# Altium PCB STM32H743I-EVAL2PCBDESIGN.PcbDoc (part 3 of 23)
Units mil, origin at the board's own origin, x right, y up, seen from the top; angles counter-clockwise.
Board outline 6558 x 5417 mil, 8 copper layers (L1_TOP, L2_GND, L3_HS1, L4_POWER, L5_SIG, L6_HS2, L7_GND, L8_BOTTOM), stack 61.368 mil thick; 620 components, 588 nets, 2945 pads, 1724 vias.
Unrouted connection lines stored in the file: 1.
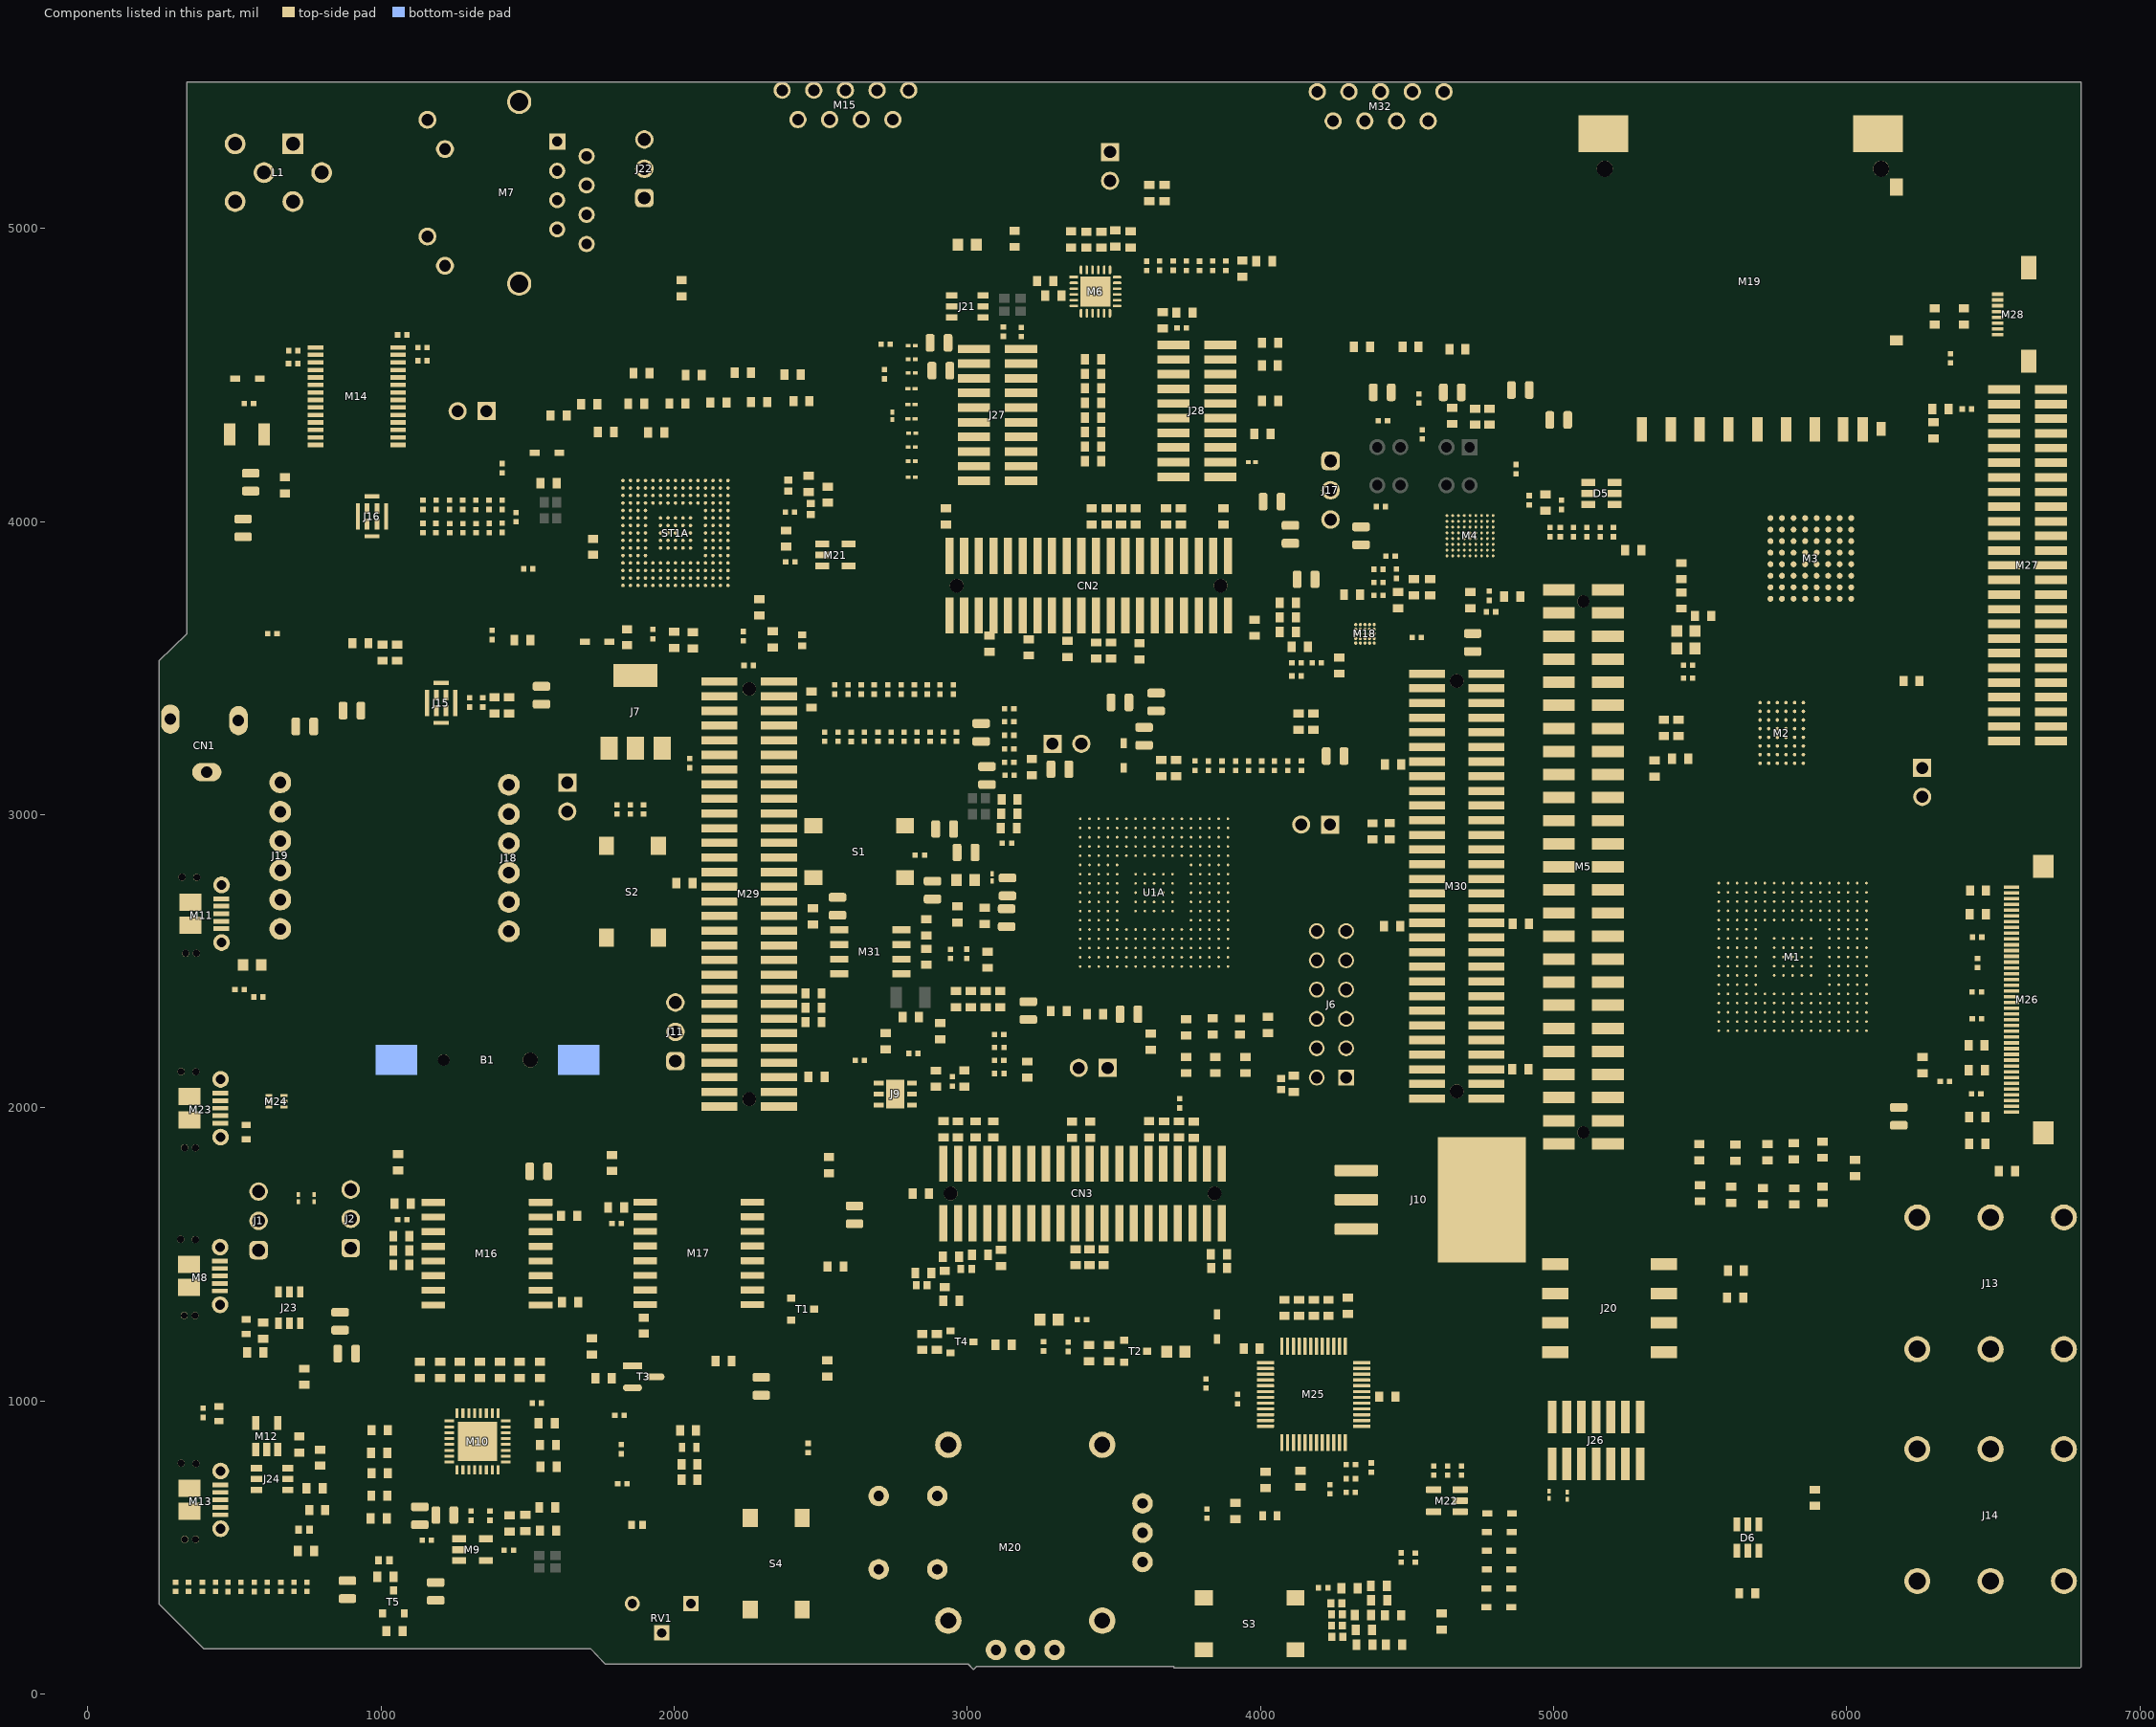
[diagram p8: the components of this part, seen from the top]

## Part data (continued)
C5 C11 C23 C25 C26 C27 C28 C29 C30 C31 C32 C33 C34 C35 C37 C38 C39 C40 C41 C42 C43 C44 C45 C46 C47 C48 C49 C50 C51 C52 C53 C54 C55 C56 C57 C58 C59 C60 C61 C62 C63 C64 C65 C66 C67 C69 C71 C73 C80 C81 C85 C89 C91 C92 C93 C96 C97 C98 C100 C101 C105 C106 C107 C108 C109 C110 C111 C115 C117 C118 C119 C120 C121 C122 C123 C125 C126 C127 C128 C129 C130 C132 C135 C138 C139 C140 C141 C142 C143 C144 C145 C146 C147 C148 C149 C150 C155 C156 C157 C158 C159 C160 C162 C163 C164 C165 C166 C167 C169 C170 C171 C172: library part CC0402KRX7R7BB104, "16V 100nF X7R ±10% 0402 Multilayer Ceramic Capacitors MLCC - SMD/SMT ROHS", Case Code (Imperial)=0402, Case Code (Metric)=1005, Dielectric=X7R, Dielectric Material=Ceramic, Manufacturer="Yageo Group", Max Operating Temperature=125°C, Min Operating Temperature=-55°C, Supplier Part Number=311-1338-6-ND, Temperature Coefficient=30ppm/°C, Tolerance=10%, Voltage=16V, Case/Package=0402, Category="Ceramic Capacitors", China RoHS=Compliant, ComponentLink1Description=https://datasheet.octopart.com:443/CC0402KRX7R7BB104-Yageo-datasheet-177165144.pdf?src-supplier=IHS, ComponentLink1URL=https://datasheet.octopart.com:443/CC0402KRX7R7BB104-Yageo-datasheet-177165144.pdf?src-supplier=IHS, ComponentLink2Description=https://datasheet.octopart.com/CC0402KRX7R7BB104-Yageo-datasheet-10883670.pdf, ComponentLink2URL=https://datasheet.octopart.com/CC0402KRX7R7BB104-Yageo-datasheet-10883670.pdf, ComponentLink3Description=https://datasheet.octopart.com/CC0402KRX7R7BB104-Yageo-datasheet-12526321.pdf, ComponentLink3URL=https://datasheet.octopart.com/CC0402KRX7R7BB104-Yageo-datasheet-12526321.pdf, ComponentLink4Description=https://datasheet.octopart.com:443/CC0402KRX7R7BB104-Yageo-datasheet-82288757.pdf?src-supplier=Upverter, ComponentLink4URL=https://datasheet.octopart.com:443/CC0402KRX7R7BB104-Yageo-datasheet-82288757.pdf?src-supplier=Upverter, ComponentLink5Description=https://datasheet.octopart.com:443/CC0402KRX7R7BB104-Yageo-datasheet-78855684.pdf?src-supplier=Upverter, ComponentLink5URL=https://datasheet.octopart.com:443/CC0402KRX7R7BB104-Yageo-datasheet-78855684.pdf?src-supplier=Upverter, ComponentLink6Description=https://datasheet.octopart.com:443/CC0402KRX7R7BB104-Yageo-datasheet-68298032.pdf?src-supplier=Upverter, ComponentLink6URL=https://datasheet.octopart.com:443/CC0402KRX7R7BB104-Yageo-datasheet-68298032.pdf?src-supplier=Upverter, ComponentLink7Description=https://datasheet.octopart.com:443/CC0402KRX7R7BB104-Yageo-datasheet-181967370.pdf?src-supplier=Newark, ComponentLink7URL=https://datasheet.octopart.com:443/CC0402KRX7R7BB104-Yageo-datasheet-181967370.pdf?src-supplier=Newark, ComponentLink8Description=https://datasheet.octopart.com:443/CC0402KRX7R7BB104-Yageo-datasheet-181967368.pdf?src-supplier=Newark, ComponentLink8URL=https://datasheet.octopart.com:443/CC0402KRX7R7BB104-Yageo-datasheet-181967368.pdf?src-supplier=Newark, ComponentLink9Description=https://datasheet.octopart.com:443/CC0402KRX7R7BB104-Yageo-datasheet-499490.pdf?src-supplier=Newark, ComponentLink9URL=https://datasheet.octopart.com:443/CC0402KRX7R7BB104-Yageo-datasheet-499490.pdf?src-supplier=Newark, ComponentLink10Description=https://datasheet.octopart.com:443/CC0402KRX7R7BB104-Yageo-datasheet-519481.pdf?src-supplier=Newark, ComponentLink10URL=https://datasheet.octopart.com:443/CC0402KRX7R7BB104-Yageo-datasheet-519481.pdf?src-supplier=Newark, ComponentLink11Description=https://datasheet.octopart.com:443/CC0402KRX7R7BB104-Yageo-datasheet-182050774.pdf?src-supplier=Newark, ComponentLink11URL=https://datasheet.octopart.com:443/CC0402KRX7R7BB104-Yageo-datasheet-182050774.pdf?src-supplier=Newark, ComponentLink12Description=https://datasheet.octopart.com:443/CC0402KRX7R7BB104-Yageo-datasheet-62336348.pdf?src-supplier=Farnell, ComponentLink12URL=https://datasheet.octopart.com:443/CC0402KRX7R7BB104-Yageo-datasheet-62336348.pdf?src-supplier=Farnell, ComponentLink13Description=https://datasheet.octopart.com:443/CC0402KRX7R7BB104-Yageo-datasheet-151948686.pdf?src-supplier=Farnell, ComponentLink13URL=https://datasheet.octopart.com:443/CC0402KRX7R7BB104-Yageo-datasheet-151948686.pdf?src-supplier=Farnell, ComponentLink14Description=https://datasheet.octopart.com:443/CC0402KRX7R7BB104-Yageo-Group-datasheet-188689702.pdf?src-supplier=Farnell, ComponentLink14URL=https://datasheet.octopart.com:443/CC0402KRX7R7BB104-Yageo-Group-datasheet-188689702.pdf?src-supplier=Farnell, ComponentLink15Description=https://datasheet.octopart.com:443/CC0402KRX7R7BB104-Yageo-datasheet-8359971.pdf?src-supplier=Farnell, ComponentLink15URL=https://datasheet.octopart.com:443/CC0402KRX7R7BB104-Yageo-datasheet-8359971.pdf?src-supplier=Farnell, ComponentLink16Description=https://datasheet.octopart.com:443/CC0402KRX7R7BB104-Yageo-datasheet-500777.pdf?src-supplier=Farnell, ComponentLink16URL=https://datasheet.octopart.com:443/CC0402KRX7R7BB104-Yageo-datasheet-500777.pdf?src-supplier=Farnell, ComponentLink17Description=https://datasheet.octopart.com:443/CC0402KRX7R7BB104-Yageo-datasheet-137700084.pdf?src-supplier=Burklin+Elektronik, ComponentLink17URL=https://datasheet.octopart.com:443/CC0402KRX7R7BB104-Yageo-datasheet-137700084.pdf?src-supplier=Burklin+Elektronik, ComponentLink18Description=https://datasheet.octopart.com:443/CC0402KRX7R7BB104-Yageo-datasheet-27626582.pdf?src-supplier=Future+Electronics, ComponentLink18URL=https://datasheet.octopart.com:443/CC0402KRX7R7BB104-Yageo-datasheet-27626582.pdf?src-supplier=Future+Electronics, ComponentLink19Description=https://datasheet.octopart.com:443/CC0402KRX7R7BB104-Yageo-datasheet-166511530.pdf?src-supplier=Future+Electronics, ComponentLink19URL=https://datasheet.octopart.com:443/CC0402KRX7R7BB104-Yageo-datasheet-166511530.pdf?src-supplier=Future+Electronics, ComponentLink20Description=https://datasheet.octopart.com:443/CC0402KRX7R7BB104-Yageo-datasheet-137700082.pdf?src-supplier=Future+Electronics, ComponentLink20URL=https://datasheet.octopart.com:443/CC0402KRX7R7BB104-Yageo-datasheet-137700082.pdf?src-supplier=Future+Electronics, ComponentLink21Description=https://datasheet.octopart.com:443/CC0402KRX7R7BB104-Yageo-datasheet-24578986.pdf?src-supplier=Future+Electronics, ComponentLink21URL=https://datasheet.octopart.com:443/CC0402KRX7R7BB104-Yageo-datasheet-24578986.pdf?src-supplier=Future+Electronics, ComponentLink22Description=https://datasheet.octopart.com:443/CC0402KRX7R7BB104-Yageo-datasheet-10911834.pdf?src-supplier=Future+Electronics, ComponentLink22URL=https://datasheet.octopart.com:443/CC0402KRX7R7BB104-Yageo-datasheet-10911834.pdf?src-supplier=Future+Electronics, ComponentLink23Description=https://datasheet.octopart.com:443/CC0402KRX7R7BB104-Yageo-datasheet-8324442.pdf?src-supplier=Future+Electronics, ComponentLink23URL=https://datasheet.octopart.com:443/CC0402KRX7R7BB104-Yageo-datasheet-8324442.pdf?src-supplier=Future+Electronics, ComponentLink24Description=https://datasheet.octopart.com:443/CC0402KRX7R7BB104-Yageo-datasheet-15895757.pdf?src-supplier=element14+APAC, ComponentLink24URL=https://datasheet.octopart.com:443/CC0402KRX7R7BB104-Yageo-datasheet-15895757.pdf?src-supplier=element14+APAC, ComponentLink25Description=https://datasheet.octopart.com:443/CC0402KRX7R7BB104-Yageo-Group-datasheet-184163374.pdf?src-supplier=LCSC, ComponentLink25URL=https://datasheet.octopart.com:443/CC0402KRX7R7BB104-Yageo-Group-datasheet-184163374.pdf?src-supplier=LCSC, ComponentLink26Description=https://datasheet.octopart.com:443/CC0402KRX7R7BB104-Yageo-Group-datasheet-165992755.pdf?src-supplier=ODG+(Origin+Data+Global), ComponentLink26URL=https://datasheet.octopart.com:443/CC0402KRX7R7BB104-Yageo-Group-datasheet-165992755.pdf?src-supplier=ODG+(Origin+Data+Global), ComponentLink27Description=https://datasheet.octopart.com:443/CC0402KRX7R7BB104-Yageo-datasheet-140260305.pdf?src-supplier=SOS+electronic, ComponentLink27URL=https://datasheet.octopart.com:443/CC0402KRX7R7BB104-Yageo-datasheet-140260305.pdf?src-supplier=SOS+electronic, ComponentLink28Description=https://datasheet.octopart.com:443/CC0402KRX7R7BB104-Yageo-datasheet-151978998.pdf?src-supplier=SOS+electronic, ComponentLink28URL=https://datasheet.octopart.com:443/CC0402KRX7R7BB104-Yageo-datasheet-151978998.pdf?src-supplier=SOS+electronic, ComponentLink29Description=https://datasheet.octopart.com:443/CC0402KRX7R7BB104-Yageo-datasheet-8701427.pdf?src-supplier=element14, ComponentLink29URL=https://datasheet.octopart.com:443/CC0402KRX7R7BB104-Yageo-datasheet-8701427.pdf?src-supplier=element14, ComponentLink30Description=https://datasheet.octopart.com:443/CC0402KRX7R7BB104-Yageo-datasheet-5301394.pdf?src-supplier=element14, ComponentLink30URL=https://datasheet.octopart.com:443/CC0402KRX7R7BB104-Yageo-datasheet-5301394.pdf?src-supplier=element14, ComponentLink31Description=http://sigma.octopart.com:80/rohs_statement/Surface-Mount-Ceramic-Multilayer-Capacitors%3B-General-Purpose-%26-High-Capacitance-Class-2%2C-X7R-Yageo-family-124.pdf?src-supplier=Compliance+Statements, ComponentLink31URL=http://sigma.octopart.com:80/rohs_statement/Surface-Mount-Ceramic-Multilayer-Capacitors%3B-General-Purpose-%26-High-Capacitance-Class-2%2C-X7R-Yageo-family-124.pdf?src-supplier=Compliance+Statements, ComponentLink32Description=http://sigma.octopart.com:80/reach_statement/Surface-Mount-Ceramic-Multilayer-Capacitors%3B-General-Purpose-%26-High-Capacitance-Class-2%2C-X7R-Yageo-family-125.pdf?src-supplier=Compliance+Statements, ComponentLink32URL=http://sigma.octopart.com:80/reach_statement/Surface-Mount-Ceramic-Multilayer-Capacitors%3B-General-Purpose-%26-High-Capacitance-Class-2%2C-X7R-Yageo-family-125.pdf?src-supplier=Compliance+Statements, ComponentLink33Description=http://sigma.octopart.com:80/conflict_mineral_statement/Yageo-company-3.pdf?src-supplier=Compliance+Statements, ComponentLink33URL=http://sigma.octopart.com:80/conflict_mineral_statement/Yageo-company-3.pdf?src-supplier=Compliance+Statements, ComponentLink34Description=http://sigma.octopart.com:80/rohs_statement/Yageo-company-2.pdf?src-supplier=Compliance+Statements, ComponentLink34URL=http://sigma.octopart.com:80/rohs_statement/Yageo-company-2.pdf?src-supplier=Compliance+Statements, Composition=Ceramic, Country of Origin="Mainland China, Taiwan", Depth=500µm, Export Control Classification Number (ECCN) Code=EAR99, Halogen Free="Halogen Free", Harmonized Tariff Schedule (HTS) Code=8532.24.00.20, Height=500µm, Introduction Date=2009-04-17, Lead Free="Lead Free", Length=1mm, Lifecycle Status=Production, Manufacturer Part Number=CC0402KRX7R7BB104, Material=Ceramic, Mounting Technology="Surface Mount", Number of Terminals=2, Pins=2, Pricing="1=0.1, 10=0.034, 50=0.0224, 100=0.0191, 500=0.01342 (USD)", Radiation Hardening=No, REACH SVHC=Yes, RoHS=Compliant, Schedule B="8532240020, 8532240020|8532240020, 8532240020|8532240020|8532240020, 8532240020|8532240020|8532240020|8532240020", Stock=6066978, Supplier=DigiKey, Termination=SMD/SMT, Thickness=558.8µm, Voltage Rating=16V, Voltage Rating (AC)=16V, Voltage Rating (DC)=16V, Width=500µm
C6: library part C0402C224M9PAC3455TU, ".220UF 6.3V", Manufacturer="Yageo Group", Supplier Part Number=399-C0402C224M9PAC3455TUTR-ND, Category="Ceramic Capacitors", Manufacturer Part Number=C0402C224M9PAC3455TU, Pricing="10000=0.08707 (USD)", Supplier=DigiKey
C7: library part CC0402JRNPO9BN221, "50V 220pF NP0 ±5% 0402 Multilayer Ceramic Capacitors MLCC - SMD/SMT ROHS", Case Code (Imperial)=0402, Case Code (Metric)=1005, Dielectric=C0G, Dielectric Material=Ceramic, Manufacturer="Yageo Group", Max Operating Temperature=125°C, Min Operating Temperature=-55°C, Supplier Part Number=311-1416-6-ND, Temperature Coefficient=30ppm/°C, Tolerance=5%, Voltage=50V, Case/Package=0402, Category="Ceramic Capacitors", China RoHS=Compliant, ComponentLink1Description=https://datasheet.octopart.com:443/CC0402JRNPO9BN221-Yageo-datasheet-182140217.pdf?src-supplier=IHS, ComponentLink1URL=https://datasheet.octopart.com:443/CC0402JRNPO9BN221-Yageo-datasheet-182140217.pdf?src-supplier=IHS, ComponentLink2Description=https://datasheet.octopart.com:443/CC0402JRNPO9BN221-Yageo-datasheet-10406438.pdf?src-supplier=element14+APAC, ComponentLink2URL=https://datasheet.octopart.com:443/CC0402JRNPO9BN221-Yageo-datasheet-10406438.pdf?src-supplier=element14+APAC, ComponentLink3Description=https://datasheet.octopart.com:443/CC0402JRNPO9BN221-Yageo-datasheet-67645495.pdf?src-supplier=element14+APAC, ComponentLink3URL=https://datasheet.octopart.com:443/CC0402JRNPO9BN221-Yageo-datasheet-67645495.pdf?src-supplier=element14+APAC, ComponentLink4Description=https://datasheet.octopart.com:443/CC0402JRNPO9BN221-Yageo-datasheet-65873193.pdf?src-supplier=element14+APAC, ComponentLink4URL=https://datasheet.octopart.com:443/CC0402JRNPO9BN221-Yageo-datasheet-65873193.pdf?src-supplier=element14+APAC, ComponentLink5Description=https://datasheet.octopart.com:443/CC0402JRNPO9BN221-Yageo-datasheet-10882999.pdf?src-supplier=element14+APAC, ComponentLink5URL=https://datasheet.octopart.com:443/CC0402JRNPO9BN221-Yageo-datasheet-10882999.pdf?src-supplier=element14+APAC, ComponentLink6Description=https://datasheet.octopart.com:443/CC0402JRNPO9BN221-Yageo-datasheet-78855684.pdf?src-supplier=Upverter, ComponentLink6URL=https://datasheet.octopart.com:443/CC0402JRNPO9BN221-Yageo-datasheet-78855684.pdf?src-supplier=Upverter, ComponentLink7Description=https://datasheet.octopart.com:443/CC0402JRNPO9BN221-Yageo-datasheet-151948684.pdf?src-supplier=Newark, ComponentLink7URL=https://datasheet.octopart.com:443/CC0402JRNPO9BN221-Yageo-datasheet-151948684.pdf?src-supplier=Newark, ComponentLink8Description=https://datasheet.octopart.com:443/CC0402JRNPO9BN221-Yageo-datasheet-181967028.pdf?src-supplier=Newark, ComponentLink8URL=https://datasheet.octopart.com:443/CC0402JRNPO9BN221-Yageo-datasheet-181967028.pdf?src-supplier=Newark, ComponentLink9Description=https://datasheet.octopart.com:443/CC0402JRNPO9BN221-Yageo-datasheet-5301394.pdf?src-supplier=Newark, ComponentLink9URL=https://datasheet.octopart.com:443/CC0402JRNPO9BN221-Yageo-datasheet-5301394.pdf?src-supplier=Newark, ComponentLink10Description=https://datasheet.octopart.com:443/CC0402JRNPO9BN221-Yageo-datasheet-24578986.pdf?src-supplier=Seeed+Studio, ComponentLink10URL=https://datasheet.octopart.com:443/CC0402JRNPO9BN221-Yageo-datasheet-24578986.pdf?src-supplier=Seeed+Studio, ComponentLink11Description=https://datasheet.octopart.com:443/CC0402JRNPO9BN221-Yageo-datasheet-8817079.pdf?src-supplier=element14, ComponentLink11URL=https://datasheet.octopart.com:443/CC0402JRNPO9BN221-Yageo-datasheet-8817079.pdf?src-supplier=element14, ComponentLink12Description=https://datasheet.octopart.com:443/CC0402JRNPO9BN221-Yageo-datasheet-8324240.pdf?src-supplier=element14, ComponentLink12URL=https://datasheet.octopart.com:443/CC0402JRNPO9BN221-Yageo-datasheet-8324240.pdf?src-supplier=element14, ComponentLink13Description=https://datasheet.octopart.com:443/CC0402JRNPO9BN221-Yageo-datasheet-504625.pdf?src-supplier=element14, ComponentLink13URL=https://datasheet.octopart.com:443/CC0402JRNPO9BN221-Yageo-datasheet-504625.pdf?src-supplier=element14, ComponentLink14Description=https://datasheet.octopart.com:443/CC0402JRNPO9BN221-Yageo-datasheet-5321569.pdf?src-supplier=element14, ComponentLink14URL=https://datasheet.octopart.com:443/CC0402JRNPO9BN221-Yageo-datasheet-5321569.pdf?src-supplier=element14, ComponentLink15Description=https://datasheet.octopart.com:443/CC0402JRNPO9BN221-Yageo-Group-datasheet-188129580.pdf?src-supplier=LCSC, ComponentLink15URL=https://datasheet.octopart.com:443/CC0402JRNPO9BN221-Yageo-Group-datasheet-188129580.pdf?src-supplier=LCSC, ComponentLink16Description=https://datasheet.octopart.com:443/CC0402JRNPO9BN221-Yageo-datasheet-137875056.pdf?src-supplier=Future+Electronics, ComponentLink16URL=https://datasheet.octopart.com:443/CC0402JRNPO9BN221-Yageo-datasheet-137875056.pdf?src-supplier=Future+Electronics, ComponentLink17Description=https://datasheet.octopart.com:443/CC0402JRNPO9BN221-Yageo-datasheet-136957424.pdf?src-supplier=Future+Electronics, ComponentLink17URL=https://datasheet.octopart.com:443/CC0402JRNPO9BN221-Yageo-datasheet-136957424.pdf?src-supplier=Future+Electronics, ComponentLink18Description=https://datasheet.octopart.com:443/CC0402JRNPO9BN221-Yageo-datasheet-137700082.pdf?src-supplier=Future+Electronics, ComponentLink18URL=https://datasheet.octopart.com:443/CC0402JRNPO9BN221-Yageo-datasheet-137700082.pdf?src-supplier=Future+Electronics, ComponentLink19Description=https://datasheet.octopart.com:443/CC0402JRNPO9BN221-Yageo-datasheet-62126864.pdf?src-supplier=Future+Electronics, ComponentLink19URL=https://datasheet.octopart.com:443/CC0402JRNPO9BN221-Yageo-datasheet-62126864.pdf?src-supplier=Future+Electronics, ComponentLink20Description=https://datasheet.octopart.com:443/CC0402JRNPO9BN221-Yageo-datasheet-62091628.pdf?src-supplier=Future+Electronics, ComponentLink20URL=https://datasheet.octopart.com:443/CC0402JRNPO9BN221-Yageo-datasheet-62091628.pdf?src-supplier=Future+Electronics, ComponentLink21Description=https://datasheet.octopart.com:443/CC0402JRNPO9BN221-Yageo-datasheet-16730043.pdf?src-supplier=Future+Electronics, ComponentLink21URL=https://datasheet.octopart.com:443/CC0402JRNPO9BN221-Yageo-datasheet-16730043.pdf?src-supplier=Future+Electronics, ComponentLink22Description=https://datasheet.octopart.com:443/CC0402JRNPO9BN221-Yageo-datasheet-12589826.pdf?src-supplier=Future+Electronics, ComponentLink22URL=https://datasheet.octopart.com:443/CC0402JRNPO9BN221-Yageo-datasheet-12589826.pdf?src-supplier=Future+Electronics, ComponentLink23Description=https://datasheet.octopart.com:443/CC0402JRNPO9BN221-Yageo-datasheet-10621397.pdf?src-supplier=Farnell, ComponentLink23URL=https://datasheet.octopart.com:443/CC0402JRNPO9BN221-Yageo-datasheet-10621397.pdf?src-supplier=Farnell, ComponentLink24Description=http://sigma.octopart.com:80/conflict_mineral_statement/Yageo-company-3.pdf?src-supplier=Compliance+Statements, ComponentLink24URL=http://sigma.octopart.com:80/conflict_mineral_statement/Yageo-company-3.pdf?src-supplier=Compliance+Statements, ComponentLink25Description=http://sigma.octopart.com:80/rohs_statement/Yageo-company-2.pdf?src-supplier=Compliance+Statements, ComponentLink25URL=http://sigma.octopart.com:80/rohs_statement/Yageo-company-2.pdf?src-supplier=Compliance+Statements, Country of Origin="Mainland China, Taiwan", Depth=500µm, Dissipation Factor=0.1%, Export Control Classification Number (ECCN) Code=EAR99, Halogen Free="Halogen Free", Harmonized Tariff Schedule (HTS) Code=8532.24.00.20, Height=500µm, Introduction Date=2005-07-07, Lead Free="Lead Free", Length=1mm, Lifecycle Status=Production, Manufacturer Part Number=CC0402JRNPO9BN221, Mounting Technology="Surface Mount", Number of Terminals=2, Packaging="Cut Tape (CT)", Pins=2, Pricing="1=0.1, 10=0.037, 50=0.0246, 100=0.021, 500=0.01486 (USD)", Radiation Hardening=No, REACH SVHC=Yes, RoHS=Compliant, Schedule B="8532240020, 8532240020|8532240020|8532240020|8532240020|8532240020|8532240020|8532240020|8532240020|8532240020|8532240020|8532240020|8532240020|8532240020|8532240020|8532240020|8532240020|8532240020|8532240020|8532240020|8532240020|8532240020|8532240020|8532240020|85", Stock=295991, Supplier=DigiKey, Termination=SMD/SMT, Thickness=558.8µm, Voltage Rating=50V, Voltage Rating (AC)=50V, Voltage Rating (DC)=50V, Width=500µm
C8: library part CL05A474KO5NNNC, "16V 470nF X5R 卤10% 0402 Multilayer Ceramic Capacitors MLCC - SMD/SMT ROHS", Case/Package=0402, Dielectric=X5R, Dielectric Material=Ceramic, Manufacturer="Samsung Electro-Mechanics", Max Operating Temperature=85°C, Min Operating Temperature=-55°C, Supplier Part Number=1276-CL05A474KO5NNNCDKR-ND, Tolerance=10%, Voltage Rating=16V, Category="Ceramic Capacitors", China RoHS=Compliant, ComponentLink1Description=https://datasheet.octopart.com:443/CL05A474KO5NNNC-Samsung-Electro-Mechanics-datasheet-141346833.pdf?src-supplier=IHS, ComponentLink1URL=https://datasheet.octopart.com:443/CL05A474KO5NNNC-Samsung-Electro-Mechanics-datasheet-141346833.pdf?src-supplier=IHS, ComponentLink2Description=https://datasheet.octopart.com/CL05A474KO5NNNC-Samsung-Electro-Mechanics-datasheet-8324245.pdf, ComponentLink2URL=https://datasheet.octopart.com/CL05A474KO5NNNC-Samsung-Electro-Mechanics-datasheet-8324245.pdf, ComponentLink3Description=https://datasheet.octopart.com/CL05A474KO5NNNC-Samsung-Electro-Mechanics-datasheet-97040617.pdf, ComponentLink3URL=https://datasheet.octopart.com/CL05A474KO5NNNC-Samsung-Electro-Mechanics-datasheet-97040617.pdf, Country of Origin="Mainland China, Philippines, South Korea", Export Control Classification Number (ECCN) Code=EAR99, Harmonized Tariff Schedule (HTS) Code=8532.24.00.20, Height=550µm, Introduction Date=2010-07-30, Length=1mm, Lifecycle Status=Production, Manufacturer Part Number=CL05A474KO5NNNC, Material=Ceramic, Mounting Technology="Surface Mount", Number of Terminals=2, Pricing="1=0.16, 10=0.093, 50=0.0654, 100=0.0569, 500=0.0428 (USD)", REACH SVHC=Yes, RoHS=Compliant, Stock=77493, Supplier=DigiKey, Voltage Rating (DC)=16V, Width=500µm
C9 C10 C18 C20 C90 C99 C136: library part GRM188R61A106KE69D, "Multilayer Ceramic Capacitor, 10 uF, 10 V, ± 10%, X5R, 0603 [1608 Metric]", Case Code (Imperial)=0603, Case Code (Metric)=1608, Dielectric=X5R, Dielectric Material=Ceramic, Manufacturer=Murata, Max Operating Temperature=85°C, Min Operating Temperature=-55°C, Tolerance=10%, Voltage=10V, Case/Package=0603, Category="Ceramic Capacitors", ComponentLink1Description=https://datasheet.octopart.com:443/GRM188R61A106KE69D-Murata-datasheet-182088559.pdf?src-supplier=IHS, ComponentLink1URL=https://datasheet.octopart.com:443/GRM188R61A106KE69D-Murata-datasheet-182088559.pdf?src-supplier=IHS, ComponentLink2Description=https://datasheet.octopart.com:443/GRM188R61A106KE69D-Murata-datasheet-46741888.pdf?src-supplier=element14+APAC, ComponentLink2URL=https://datasheet.octopart.com:443/GRM188R61A106KE69D-Murata-datasheet-46741888.pdf?src-supplier=element14+APAC, ComponentLink3Description=https://datasheet.octopart.com:443/GRM188R61A106KE69D-Murata-datasheet-66152891.pdf?src-supplier=TME, ComponentLink3URL=https://datasheet.octopart.com:443/GRM188R61A106KE69D-Murata-datasheet-66152891.pdf?src-supplier=TME, ComponentLink4Description=https://datasheet.octopart.com:443/GRM188R61A106KE69D-Murata-datasheet-138742815.pdf?src-supplier=Ciiva, ComponentLink4URL=https://datasheet.octopart.com:443/GRM188R61A106KE69D-Murata-datasheet-138742815.pdf?src-supplier=Ciiva, ComponentLink5Description=https://datasheet.octopart.com/GRM188R61A106KE69D-Murata-datasheet-12515295.pdf, ComponentLink5URL=https://datasheet.octopart.com/GRM188R61A106KE69D-Murata-datasheet-12515295.pdf, ComponentLink6Description=https://datasheet.octopart.com/GRM188R61A106KE69D-Murata-datasheet-12510076.pdf, ComponentLink6URL=https://datasheet.octopart.com/GRM188R61A106KE69D-Murata-datasheet-12510076.pdf, ComponentLink7Description=https://datasheet.octopart.com/GRM188R61A106KE69D-Murata-datasheet-11978611.pdf, ComponentLink7URL=https://datasheet.octopart.com/GRM188R61A106KE69D-Murata-datasheet-11978611.pdf, ComponentLink8Description=https://datasheet.octopart.com/GRM188R61A106KE69D-Murata-datasheet-10025737.pdf, ComponentLink8URL=https://datasheet.octopart.com/GRM188R61A106KE69D-Murata-datasheet-10025737.pdf, ComponentLink9Description=https://datasheet.octopart.com/GRM188R61A106KE69D-Murata-datasheet-8819587.pdf, ComponentLink9URL=https://datasheet.octopart.com/GRM188R61A106KE69D-Murata-datasheet-8819587.pdf, ComponentLink10Description=https://datasheet.octopart.com/GRM188R61A106KE69D-Murata-datasheet-14401048.pdf, ComponentLink10URL=https://datasheet.octopart.com/GRM188R61A106KE69D-Murata-datasheet-14401048.pdf, ComponentLink11Description=http://sigma.octopart.com:80/reach_statement/Murata-company-16.pdf?src-supplier=Compliance+Statements, ComponentLink11URL=http://sigma.octopart.com:80/reach_statement/Murata-company-16.pdf?src-supplier=Compliance+Statements, Country of Origin="Japan, Mainland China, Philippines, Singapore, Thailand", Depth=800µm, Export Control Classification Number (ECCN) Code=EAR99, Harmonized Tariff Schedule (HTS) Code=8532.24.00.20, Height=800µm, Introduction Date=2013-05-21, Lead Free="Lead Free", Length=1.6mm, Lifecycle Status=Production, LTB Date=2023-12-01, LTD Date=2023-12-01, Manufacturer Part Number=GRM188R61A106KE69D, Material=Ceramic, Mounting Technology="Surface Mount", Number of Terminals=2, REACH SVHC=Yes, RoHS=Compliant, Schedule B=8532240020, Supplier="Arrow Electronics", Supplier Part Number=GRM188R61A106KE69D, Voltage Rating=10V, Voltage Rating (DC)=10V, Width=800µm
C12 C13 C14 C19 C36 C68 C72 C74 C77 C78 C79 C83 C84 C104 C116 C153 C168: library part CL05A475MO5NUNC, "16V 4.7uF X5R 卤20% 0402 Multilayer Ceramic Capacitors MLCC - SMD/SMT ROHS", Case Code (Imperial)=0402, Case Code (Metric)=1005, Dielectric=X5R, Dielectric Material=Ceramic, Manufacturer="Samsung Electro-Mechanics", Max Operating Temperature=85°C, Min Operating Temperature=-55°C, Supplier Part Number=1276-6836-6-ND, Tolerance=20%, Voltage Rating=16V, Case/Package=0402, Category="Ceramic Capacitors", China RoHS=Compliant, ComponentLink1Description=https://datasheet.octopart.com:443/CL05A475MO5NUNC-Samsung-Electro-Mechanics-datasheet-178175196.pdf?src-supplier=Farnell, ComponentLink1URL=https://datasheet.octopart.com:443/CL05A475MO5NUNC-Samsung-Electro-Mechanics-datasheet-178175196.pdf?src-supplier=Farnell, ComponentLink2Description=https://datasheet.octopart.com:443/CL05A475MO5NUNC-Samsung-Electro-Mechanics-datasheet-123102911.pdf?src-supplier=Future+Electronics, ComponentLink2URL=https://datasheet.octopart.com:443/CL05A475MO5NUNC-Samsung-Electro-Mechanics-datasheet-123102911.pdf?src-supplier=Future+Electronics, ComponentLink3Description=https://datasheet.octopart.com:443/CL05A475MO5NUNC-Samsung-Electro-Mechanics-datasheet-110226225.pdf?src-supplier=Future+Electronics, ComponentLink3URL=https://datasheet.octopart.com:443/CL05A475MO5NUNC-Samsung-Electro-Mechanics-datasheet-110226225.pdf?src-supplier=Future+Electronics, ComponentLink4Description=https://datasheet.octopart.com:443/CL05A475MO5NUNC-Samsung-Electro-Mechanics-datasheet-83567908.pdf?src-supplier=Future+Electronics, ComponentLink4URL=https://datasheet.octopart.com:443/CL05A475MO5NUNC-Samsung-Electro-Mechanics-datasheet-83567908.pdf?src-supplier=Future+Electronics, ComponentLink5Description=https://datasheet.octopart.com:443/CL05A475MO5NUNC-Samsung-Electro-Mechanics-datasheet-68297032.pdf?src-supplier=Future+Electronics, ComponentLink5URL=https://datasheet.octopart.com:443/CL05A475MO5NUNC-Samsung-Electro-Mechanics-datasheet-68297032.pdf?src-supplier=Future+Electronics, ComponentLink6Description=https://datasheet.octopart.com:443/CL05A475MO5NUNC-Samsung-Electro-Mechanics-datasheet-87580057.pdf?src-supplier=Future+Electronics, ComponentLink6URL=https://datasheet.octopart.com:443/CL05A475MO5NUNC-Samsung-Electro-Mechanics-datasheet-87580057.pdf?src-supplier=Future+Electronics, ComponentLink7Description=https://datasheet.octopart.com:443/CL05A475MO5NUNC-Samsung-Electro-Mechanics-datasheet-149136694.pdf?src-supplier=Future+Electronics, ComponentLink7URL=https://datasheet.octopart.com:443/CL05A475MO5NUNC-Samsung-Electro-Mechanics-datasheet-149136694.pdf?src-supplier=Future+Electronics, Height=500µm, Length=1mm, Lifecycle Status=Production, Manufacturer Part Number=CL05A475MO5NUNC, Material=Ceramic, Mounting Technology="Surface Mount", Number of Terminals=2, Pricing="1=0.43, 10=0.26, 50=0.1918, 100=0.1709, 500=0.13574 (USD)", REACH SVHC=Yes, RoHS=Compliant, Schedule B="8532240020, 8532240020|8532240020, 8532240020|8532240020|8532240020, 8532240020|8532240020|8532240020|8532240020", Stock=1005448, Supplier=DigiKey, Thickness=558.8µm, Voltage Rating (DC)=16V, Width=500µm
C15 C16 C17 C86 C87 C88 C112 C133 C151 C152: library part CC1206KKX7R7BB225, "Surface Mount Ceramic Multilayer Capacitor 2.2uF 10% X7R 16V 1206 Blister T/R", Case Code (Imperial)=1206, Case Code (Metric)=3216, Dielectric=X7R, Dielectric Material=Ceramic, Manufacturer="Yageo Group", Max Operating Temperature=125°C, Min Operating Temperature=-55°C, Supplier Part Number=311-1957-1-ND, Tolerance=10%, Voltage=16V, Case/Package=1206, Category="Ceramic Capacitors", China RoHS=Compliant, ComponentLink1Description=https://datasheet.octopart.com:443/CC1206KKX7R7BB225-Yageo-datasheet-177165144.pdf?src-supplier=IHS, ComponentLink1URL=https://datasheet.octopart.com:443/CC1206KKX7R7BB225-Yageo-datasheet-177165144.pdf?src-supplier=IHS, ComponentLink2Description=https://datasheet.octopart.com:443/CC1206KKX7R7BB225-Yageo-datasheet-116051370.pdf?src-supplier=Upverter, ComponentLink2URL=https://datasheet.octopart.com:443/CC1206KKX7R7BB225-Yageo-datasheet-116051370.pdf?src-supplier=Upverter, ComponentLink3Description=https://datasheet.octopart.com:443/CC1206KKX7R7BB225-Yageo-datasheet-82288757.pdf?src-supplier=Upverter, ComponentLink3URL=https://datasheet.octopart.com:443/CC1206KKX7R7BB225-Yageo-datasheet-82288757.pdf?src-supplier=Upverter, ComponentLink4Description=https://datasheet.octopart.com:443/CC1206KKX7R7BB225-Yageo-datasheet-147453679.pdf?src-supplier=Farnell, ComponentLink4URL=https://datasheet.octopart.com:443/CC1206KKX7R7BB225-Yageo-datasheet-147453679.pdf?src-supplier=Farnell, ComponentLink5Description=https://datasheet.octopart.com:443/CC1206KKX7R7BB225-Yageo-datasheet-181970700.pdf?src-supplier=Farnell, ComponentLink5URL=https://datasheet.octopart.com:443/CC1206KKX7R7BB225-Yageo-datasheet-181970700.pdf?src-supplier=Farnell, ComponentLink6Description=https://datasheet.octopart.com:443/CC1206KKX7R7BB225-Yageo-datasheet-140260305.pdf?src-supplier=element14+APAC, ComponentLink6URL=https://datasheet.octopart.com:443/CC1206KKX7R7BB225-Yageo-datasheet-140260305.pdf?src-supplier=element14+APAC, ComponentLink7Description=https://datasheet.octopart.com/CC1206KKX7R7BB225-Yageo-datasheet-12526321.pdf, ComponentLink7URL=https://datasheet.octopart.com/CC1206KKX7R7BB225-Yageo-datasheet-12526321.pdf, ComponentLink8Description=https://datasheet.octopart.com/CC1206KKX7R7BB225-Yageo-datasheet-10883670.pdf, ComponentLink8URL=https://datasheet.octopart.com/CC1206KKX7R7BB225-Yageo-datasheet-10883670.pdf, ComponentLink9Description=https://datasheet.octopart.com:443/CC1206KKX7R7BB225-Yageo-Group-datasheet-189192896.pdf?src-supplier=Future+Electronics, ComponentLink9URL=https://datasheet.octopart.com:443/CC1206KKX7R7BB225-Yageo-Group-datasheet-189192896.pdf?src-supplier=Future+Electronics, ComponentLink10Description=https://datasheet.octopart.com:443/CC1206KKX7R7BB225-Yageo-datasheet-166511530.pdf?src-supplier=Future+Electronics, ComponentLink10URL=https://datasheet.octopart.com:443/CC1206KKX7R7BB225-Yageo-datasheet-166511530.pdf?src-supplier=Future+Electronics, ComponentLink11Description=https://datasheet.octopart.com:443/CC1206KKX7R7BB225-Yageo-datasheet-137700082.pdf?src-supplier=Future+Electronics, ComponentLink11URL=https://datasheet.octopart.com:443/CC1206KKX7R7BB225-Yageo-datasheet-137700082.pdf?src-supplier=Future+Electronics, ComponentLink12Description=https://datasheet.octopart.com:443/CC1206KKX7R7BB225-Yageo-datasheet-137700084.pdf?src-supplier=Future+Electronics, ComponentLink12URL=https://datasheet.octopart.com:443/CC1206KKX7R7BB225-Yageo-datasheet-137700084.pdf?src-supplier=Future+Electronics, ComponentLink13Description=https://datasheet.octopart.com:443/CC1206KKX7R7BB225-Yageo-datasheet-27626582.pdf?src-supplier=Future+Electronics, ComponentLink13URL=https://datasheet.octopart.com:443/CC1206KKX7R7BB225-Yageo-datasheet-27626582.pdf?src-supplier=Future+Electronics, ComponentLink14Description=https://datasheet.octopart.com:443/CC1206KKX7R7BB225-Yageo-datasheet-15895757.pdf?src-supplier=Future+Electronics, ComponentLink14URL=https://datasheet.octopart.com:443/CC1206KKX7R7BB225-Yageo-datasheet-15895757.pdf?src-supplier=Future+Electronics, ComponentLink15Description=https://datasheet.octopart.com:443/CC1206KKX7R7BB225-Yageo-datasheet-10911834.pdf?src-supplier=Future+Electronics, ComponentLink15URL=https://datasheet.octopart.com:443/CC1206KKX7R7BB225-Yageo-datasheet-10911834.pdf?src-supplier=Future+Electronics, ComponentLink16Description=https://datasheet.octopart.com:443/CC1206KKX7R7BB225-Yageo-datasheet-12523175.pdf?src-supplier=Future+Electronics, ComponentLink16URL=https://datasheet.octopart.com:443/CC1206KKX7R7BB225-Yageo-datasheet-12523175.pdf?src-supplier=Future+Electronics, ComponentLink17Description=https://datasheet.octopart.com:443/CC1206KKX7R7BB225-Yageo-datasheet-8324442.pdf?src-supplier=Future+Electronics, ComponentLink17URL=https://datasheet.octopart.com:443/CC1206KKX7R7BB225-Yageo-datasheet-8324442.pdf?src-supplier=Future+Electronics, ComponentLink18Description=https://datasheet.octopart.com:443/CC1206KKX7R7BB225-Yageo-Group-datasheet-184163374.pdf?src-supplier=LCSC, ComponentLink18URL=https://datasheet.octopart.com:443/CC1206KKX7R7BB225-Yageo-Group-datasheet-184163374.pdf?src-supplier=LCSC, ComponentLink19Description=https://datasheet.octopart.com:443/CC1206KKX7R7BB225-Yageo-Group-datasheet-165992755.pdf?src-supplier=ODG+(Origin+Data+Global), ComponentLink19URL=https://datasheet.octopart.com:443/CC1206KKX7R7BB225-Yageo-Group-datasheet-165992755.pdf?src-supplier=ODG+(Origin+Data+Global), ComponentLink20Description=https://datasheet.octopart.com:443/CC1206KKX7R7BB225-Yageo-datasheet-151948686.pdf?src-supplier=TME, ComponentLink20URL=https://datasheet.octopart.com:443/CC1206KKX7R7BB225-Yageo-datasheet-151948686.pdf?src-supplier=TME, ComponentLink21Description=https://datasheet.octopart.com:443/CC1206KKX7R7BB225-Yageo-datasheet-17600895.pdf?src-supplier=TME, ComponentLink21URL=https://datasheet.octopart.com:443/CC1206KKX7R7BB225-Yageo-datasheet-17600895.pdf?src-supplier=TME, ComponentLink22Description=https://datasheet.octopart.com:443/CC1206KKX7R7BB225-Yageo-datasheet-62336348.pdf?src-supplier=Newark, ComponentLink22URL=https://datasheet.octopart.com:443/CC1206KKX7R7BB225-Yageo-datasheet-62336348.pdf?src-supplier=Newark, ComponentLink23Description=http://sigma.octopart.com:80/rohs_statement/Surface-Mount-Ceramic-Multilayer-Capacitors%3B-General-Purpose-%26-High-Capacitance-Class-2%2C-X7R-Yageo-family-124.pdf?src-supplier=Compliance+Statements, ComponentLink23URL=http://sigma.octopart.com:80/rohs_statement/Surface-Mount-Ceramic-Multilayer-Capacitors%3B-General-Purpose-%26-High-Capacitance-Class-2%2C-X7R-Yageo-family-124.pdf?src-supplier=Compliance+Statements, ComponentLink24Description=http://sigma.octopart.com:80/reach_statement/Surface-Mount-Ceramic-Multilayer-Capacitors%3B-General-Purpose-%26-High-Capacitance-Class-2%2C-X7R-Yageo-family-125.pdf?src-supplier=Compliance+Statements, ComponentLink24URL=http://sigma.octopart.com:80/reach_statement/Surface-Mount-Ceramic-Multilayer-Capacitors%3B-General-Purpose-%26-High-Capacitance-Class-2%2C-X7R-Yageo-family-125.pdf?src-supplier=Compliance+Statements, ComponentLink25Description=http://sigma.octopart.com:80/conflict_mineral_statement/Yageo-company-3.pdf?src-supplier=Compliance+Statements, ComponentLink25URL=http://sigma.octopart.com:80/conflict_mineral_statement/Yageo-company-3.pdf?src-supplier=Compliance+Statements, ComponentLink26Description=http://sigma.octopart.com:80/rohs_statement/Yageo-company-2.pdf?src-supplier=Compliance+Statements, ComponentLink26URL=http://sigma.octopart.com:80/rohs_statement/Yageo-company-2.pdf?src-supplier=Compliance+Statements, Depth=1.6mm, Halogen Free="Halogen Free", Height=1.15mm, Lead Free="Lead Free", Length=3.2mm, Lifecycle Status=Production, Manufacturer Part Number=CC1206KKX7R7BB225, Material=Ceramic, Mounting Technology="Surface Mount", Number of Terminals=2, Packaging="Tape and Reel", Pins=2, Pricing="1=0.38, 10=0.221, 50=0.1606, 100=0.1421, 500=0.11082 (USD)", Radiation Hardening=No, REACH SVHC=Yes, RoHS=Compliant, Schedule B="8532240020, 8532240020|8532240020|8532240020|8532240020|8532240020", Stock=35949, Supplier=DigiKey, Termination=SMD/SMT, Thickness=1.2446mm, Voltage Rating=16V, Voltage Rating (DC)=16V, Width=1.6mm
C21 C22 C24 C70 C75 C76 C82 C95 C124 C131 C134 C137 C154 C161: library part CC0603KRX5R7BB105, "Multilayer Ceramic Capacitors MLCC – SMD/SMT; YAGEO; CC0603KRX5R7BB105; 1 µF; 0603; 16 V; 16 V", Case Code (Imperial)=0603, Case Code (Metric)=1608, Dielectric=X5R, Dielectric Material=Ceramic, Manufacturer="Yageo Group", Max Operating Temperature=85°C, Min Operating Temperature=-55°C, Supplier Part Number=311-1444-1-ND, Tolerance=10%, Voltage Rating=16V, Case/Package=0603, Category="Ceramic Capacitors", China RoHS=Compliant, ComponentLink1Description=https://datasheet.octopart.com:443/CC0603KRX5R7BB105-Yageo-datasheet-170350636.pdf?src-supplier=IHS, ComponentLink1URL=https://datasheet.octopart.com:443/CC0603KRX5R7BB105-Yageo-datasheet-170350636.pdf?src-supplier=IHS, ComponentLink2Description=https://datasheet.octopart.com:443/CC0603KRX5R7BB105-Yageo-datasheet-82288757.pdf?src-supplier=Upverter, ComponentLink2URL=https://datasheet.octopart.com:443/CC0603KRX5R7BB105-Yageo-datasheet-82288757.pdf?src-supplier=Upverter, ComponentLink3Description=https://datasheet.octopart.com:443/CC0603KRX5R7BB105-Yageo-datasheet-10911834.pdf?src-supplier=element14+APAC, ComponentLink3URL=https://datasheet.octopart.com:443/CC0603KRX5R7BB105-Yageo-datasheet-10911834.pdf?src-supplier=element14+APAC, ComponentLink4Description=https://datasheet.octopart.com:443/CC0603KRX5R7BB105-Yageo-datasheet-8324442.pdf?src-supplier=element14+APAC, ComponentLink4URL=https://datasheet.octopart.com:443/CC0603KRX5R7BB105-Yageo-datasheet-8324442.pdf?src-supplier=element14+APAC, ComponentLink5Description=https://datasheet.octopart.com:443/CC0603KRX5R7BB105-Yageo-datasheet-181968529.pdf?src-supplier=Newark, ComponentLink5URL=https://datasheet.octopart.com:443/CC0603KRX5R7BB105-Yageo-datasheet-181968529.pdf?src-supplier=Newark, ComponentLink6Description=https://datasheet.octopart.com:443/CC0603KRX5R7BB105-Yageo-datasheet-158238148.pdf?src-supplier=Newark, ComponentLink6URL=https://datasheet.octopart.com:443/CC0603KRX5R7BB105-Yageo-datasheet-158238148.pdf?src-supplier=Newark, ComponentLink7Description=https://datasheet.octopart.com:443/CC0603KRX5R7BB105-Yageo-datasheet-140260304.pdf?src-supplier=Farnell, ComponentLink7URL=https://datasheet.octopart.com:443/CC0603KRX5R7BB105-Yageo-datasheet-140260304.pdf?src-supplier=Farnell, ComponentLink8Description=https://datasheet.octopart.com:443/CC0603KRX5R7BB105-Yageo-datasheet-62067349.pdf?src-supplier=Farnell, ComponentLink8URL=https://datasheet.octopart.com:443/CC0603KRX5R7BB105-Yageo-datasheet-62067349.pdf?src-supplier=Farnell, ComponentLink9Description=https://datasheet.octopart.com:443/CC0603KRX5R7BB105-Yageo-Group-datasheet-184398209.pdf?src-supplier=LCSC, ComponentLink9URL=https://datasheet.octopart.com:443/CC0603KRX5R7BB105-Yageo-Group-datasheet-184398209.pdf?src-supplier=LCSC, ComponentLink10Description=https://datasheet.octopart.com/CC0603KRX5R7BB105-Yageo-datasheet-86397281.pdf, ComponentLink10URL=https://datasheet.octopart.com/CC0603KRX5R7BB105-Yageo-datasheet-86397281.pdf, ComponentLink11Description=https://datasheet.octopart.com:443/CC0603KRX5R7BB105-Yageo-datasheet-149070021.pdf?src-supplier=TME, ComponentLink11URL=https://datasheet.octopart.com:443/CC0603KRX5R7BB105-Yageo-datasheet-149070021.pdf?src-supplier=TME, ComponentLink12Description=https://datasheet.octopart.com:443/CC0603KRX5R7BB105-Yageo-Group-datasheet-145016144.pdf?src-supplier=ODG+(Origin+Data+Global), ComponentLink12URL=https://datasheet.octopart.com:443/CC0603KRX5R7BB105-Yageo-Group-datasheet-145016144.pdf?src-supplier=ODG+(Origin+Data+Global), ComponentLink13Description=https://datasheet.octopart.com:443/CC0603KRX5R7BB105-Yageo-datasheet-137875056.pdf?src-supplier=Future+Electronics, ComponentLink13URL=https://datasheet.octopart.com:443/CC0603KRX5R7BB105-Yageo-datasheet-137875056.pdf?src-supplier=Future+Electronics, ComponentLink14Description=https://datasheet.octopart.com:443/CC0603KRX5R7BB105-Yageo-datasheet-137700082.pdf?src-supplier=Future+Electronics, ComponentLink14URL=https://datasheet.octopart.com:443/CC0603KRX5R7BB105-Yageo-datasheet-137700082.pdf?src-supplier=Future+Electronics, ComponentLink15Description=https://datasheet.octopart.com:443/CC0603KRX5R7BB105-Yageo-datasheet-137700085.pdf?src-supplier=Future+Electronics, ComponentLink15URL=https://datasheet.octopart.com:443/CC0603KRX5R7BB105-Yageo-datasheet-137700085.pdf?src-supplier=Future+Electronics, ComponentLink16Description=https://datasheet.octopart.com:443/CC0603KRX5R7BB105-Yageo-datasheet-15895757.pdf?src-supplier=Future+Electronics, ComponentLink16URL=https://datasheet.octopart.com:443/CC0603KRX5R7BB105-Yageo-datasheet-15895757.pdf?src-supplier=Future+Electronics, ComponentLink17Description=https://datasheet.octopart.com:443/CC0603KRX5R7BB105-Yageo-datasheet-14389981.pdf?src-supplier=Future+Electronics, ComponentLink17URL=https://datasheet.octopart.com:443/CC0603KRX5R7BB105-Yageo-datasheet-14389981.pdf?src-supplier=Future+Electronics, ComponentLink18Description=https://datasheet.octopart.com:443/CC0603KRX5R7BB105-Yageo-Group-datasheet-192360830.pdf?src-supplier=Future+Electronics, ComponentLink18URL=https://datasheet.octopart.com:443/CC0603KRX5R7BB105-Yageo-Group-datasheet-192360830.pdf?src-supplier=Future+Electronics, ComponentLink19Description=https://datasheet.octopart.com:443/CC0603KRX5R7BB105-Yageo-datasheet-8701639.pdf?src-supplier=element14, ComponentLink19URL=https://datasheet.octopart.com:443/CC0603KRX5R7BB105-Yageo-datasheet-8701639.pdf?src-supplier=element14, ComponentLink20Description=https://datasheet.octopart.com:443/CC0603KRX5R7BB105-Yageo-datasheet-519481.pdf?src-supplier=element14, ComponentLink20URL=https://datasheet.octopart.com:443/CC0603KRX5R7BB105-Yageo-datasheet-519481.pdf?src-supplier=element14, ComponentLink21Description=http://sigma.octopart.com:80/conflict_mineral_statement/Yageo-company-3.pdf?src-supplier=Compliance+Statements, ComponentLink21URL=http://sigma.octopart.com:80/conflict_mineral_statement/Yageo-company-3.pdf?src-supplier=Compliance+Statements, ComponentLink22Description=http://sigma.octopart.com:80/rohs_statement/Yageo-company-2.pdf?src-supplier=Compliance+Statements, ComponentLink22URL=http://sigma.octopart.com:80/rohs_statement/Yageo-company-2.pdf?src-supplier=Compliance+Statements, Composition=Ceramic, Depth=800µm, Dissipation Factor=7%, Halogen Free="Halogen Free", Height=800µm, Lead Free="Lead Free", Length=1.6mm, Lifecycle Status=Production, Manufacturer Part Number=CC0603KRX5R7BB105, Material=Ceramic, Mounting Technology="Surface Mount", Number of Terminals=2, Pins=2, Pricing="1=0.13, 10=0.074, 50=0.0506, 100=0.0437, 500=0.03208 (USD)", Radiation Hardening=No, REACH SVHC=Yes, RoHS=Compliant, Schedule B="8532240020, 8532240020|8532240020|8532240020|8532240020|8532240020", Stock=633073, Supplier=DigiKey, Termination=SMD/SMT, Thickness=889µm, Voltage Rating (DC)=16V, Width=800µm
C94: library part C0402C471F4GACTU, "Ceramic Capacitor, Multilayer, Ceramic, 16V, 1% +Tol, 1% -Tol, C0G, 30ppm/Cel TC, 0.00047uF, Surface Mount, 0402", Case Code (Imperial)=0402, Case Code (Metric)=1005, Dielectric=C0G, Dielectric Material=Ceramic, Manufacturer="Yageo Group", Max Operating Temperature=125°C, Min Operating Temperature=-55°C, Supplier Part Number=399-C0402C471F4GACTUTR-ND, Tolerance=1%, Voltage Rating=16V, Case/Package=0402, Category="Ceramic Capacitors", China RoHS=Compliant, ComponentLink1Description=https://datasheet.octopart.com:443/C0402C471F4GACTU-KEMET-datasheet-178132257.pdf?src-supplier=IHS, ComponentLink1URL=https://datasheet.octopart.com:443/C0402C471F4GACTU-KEMET-datasheet-178132257.pdf?src-supplier=IHS, ComponentLink2Description=https://datasheet.octopart.com:443/C0402C471F4GACTU-KEMET-datasheet-137357759.pdf?src-supplier=Upverter, ComponentLink2URL=https://datasheet.octopart.com:443/C0402C471F4GACTU-KEMET-datasheet-137357759.pdf?src-supplier=Upverter, ComponentLink3Description=https://datasheet.octopart.com:443/C0402C471F4GACTU-KEMET-datasheet-157246123.pdf?src-supplier=Electro+Sonic, ComponentLink3URL=https://datasheet.octopart.com:443/C0402C471F4GACTU-KEMET-datasheet-157246123.pdf?src-supplier=Electro+Sonic, ComponentLink4Description=https://datasheet.octopart.com:443/C0402C471F4GACTU-KEMET-datasheet-149534844.pdf?src-supplier=Farnell, ComponentLink4URL=https://datasheet.octopart.com:443/C0402C471F4GACTU-KEMET-datasheet-149534844.pdf?src-supplier=Farnell, ComponentLink5Description=https://datasheet.octopart.com:443/C0402C471F4GACTU-KEMET-datasheet-68331921.pdf?src-supplier=Farnell, ComponentLink5URL=https://datasheet.octopart.com:443/C0402C471F4GACTU-KEMET-datasheet-68331921.pdf?src-supplier=Farnell, ComponentLink6Description=https://datasheet.octopart.com/C0402C471F4GACTU-KEMET-datasheet-84169754.pdf, ComponentLink6URL=https://datasheet.octopart.com/C0402C471F4GACTU-KEMET-datasheet-84169754.pdf, Country of Origin=Mexico, Depth=500µm, Export Control Classification Number (ECCN) Code=EAR99, Harmonized Tariff Schedule (HTS) Code=8532.24.00.20, Height=500µm, Introduction Date=2008-01-10, Lead Free="Lead Free", Length=1mm, Lifecycle Status=Production, Manufacturer Part Number=C0402C471F4GACTU, Material=Ceramic, Mounting Technology="Surface Mount", Number of Terminals=2, Packaging="Tape and Reel", Pins=2, Pricing="10000=0.23685 (USD)", REACH SVHC=Yes, RoHS=Compliant, Stock=10000, Supplier=DigiKey, Termination=SMD/SMT, Thickness=558.8µm, Voltage Rating (DC)=16V, Width=500µm
C102 C103: library part C0402C300F4HACAUTO, "Multilayer Ceramic Capacitors MLCC - SMD/SMT 16V 30pF X8R 0402 1% AEC-Q200", Case/Package=0402, Dielectric=X8R, Dielectric Material=Ceramic, Manufacturer="Yageo Group", Max Operating Temperature=150°C, Min Operating Temperature=-55°C, Ratings=AEC-Q200, Supplier Part Number=C0402C300F4HACAUTO-ND, Voltage Rating=16V, Category="Ceramic Capacitors", China RoHS=Compliant, ComponentLink1Description=https://datasheet.octopart.com:443/C0402C300F4HACAUTO-KEMET-datasheet-178087918.pdf?src-supplier=IHS, ComponentLink1URL=https://datasheet.octopart.com:443/C0402C300F4HACAUTO-KEMET-datasheet-178087918.pdf?src-supplier=IHS, ComponentLink2Description=https://datasheet.octopart.com:443/C0402C300F4HACAUTO-KEMET-datasheet-137357759.pdf?src-supplier=Upverter, ComponentLink2URL=https://datasheet.octopart.com:443/C0402C300F4HACAUTO-KEMET-datasheet-137357759.pdf?src-supplier=Upverter, ComponentLink3Description=https://datasheet.octopart.com/C0402C300F4HACAUTO-KEMET-datasheet-84169754.pdf, ComponentLink3URL=https://datasheet.octopart.com/C0402C300F4HACAUTO-KEMET-datasheet-84169754.pdf, Country of Origin=Mexico, Export Control Classification Number (ECCN) Code=EAR99, Harmonized Tariff Schedule (HTS) Code=8532.24.00.20, Height=500µm, Introduction Date=2017-10-02, Lead Free="Lead Free", Length=1mm, Lifecycle Status=Production, Manufacturer Part Number=C0402C300F4HACAUTO, Material=Ceramic, Mounting Technology="Surface Mount", Number of Terminals=2, Pins=2, Pricing="10000=0.02714 (USD)", REACH SVHC=Yes, RoHS=Compliant, Supplier=DigiKey, Voltage Rating (DC)=16V, Width=500µm
C113 C114: library part 0402YK330FBSTR\500, "Cap Silicon 33pF 16V 0±60ppm/C 1% SMD 0402 125C Automotive T/R", Case/Package=0402, Manufacturer="KYOCERA AVX", Max Operating Temperature=125°C, Min Operating Temperature=-55°C, Supplier Part Number=478-12128-6-ND, Temperature Coefficient=60ppm/°C, Tolerance=1%, Voltage Rating=16V, Category="Film Capacitors", China RoHS=Compliant, ComponentLink1Description=https://datasheet.octopart.com:443/0402YK330FBSTR%5C500-KYOCERA-AVX-datasheet-158242086.pdf?src-supplier=IHS, ComponentLink1URL=https://datasheet.octopart.com:443/0402YK330FBSTR%5C500-KYOCERA-AVX-datasheet-158242086.pdf?src-supplier=IHS, ComponentLink2Description=https://datasheet.octopart.com:443/0402YK330FBSTR%5C500-AVX-datasheet-152583363.pdf?src-supplier=Upverter, ComponentLink2URL=https://datasheet.octopart.com:443/0402YK330FBSTR%5C500-AVX-datasheet-152583363.pdf?src-supplier=Upverter, ComponentLink3Description=http://sigma.octopart.com:80/conflict_mineral_statement/AVX-company-34.pdf?src-supplier=Compliance+Statements, ComponentLink3URL=http://sigma.octopart.com:80/conflict_mineral_statement/AVX-company-34.pdf?src-supplier=Compliance+Statements, ComponentLink4Description=http://sigma.octopart.com:80/reach_statement/AVX-company-19.pdf?src-supplier=Compliance+Statements, ComponentLink4URL=http://sigma.octopart.com:80/reach_statement/AVX-company-19.pdf?src-supplier=Compliance+Statements, Height=400µm, Length=1mm, Lifecycle Status=Production, Manufacturer Part Number=0402YK330FBSTR\500, Material=Ceramic, Mounting Technology="Surface Mount", Number of Terminals=2, Pricing="1=1.05, 10=0.676, 50=0.527, 100=0.4811 (USD)", REACH SVHC=Yes, RoHS=Compliant, Schedule B="8532290040, 8532290040|8532290040|8532290040|8532290040|8532290040", Stock=15880, Supplier=DigiKey, Voltage Rating (DC)=16V, Width=550µm